# Altium PCB Kasli-DIOT.PCBDOC (part 13 of 23)
Units mm, origin at the board's own origin, x right, y up, seen from the top; angles counter-clockwise.
Board outline 222.9 x 100 mm, 10 copper layers (TopLayer, Layer 2, Layer 3, Layer 4, Layer 5, Layer 6, Layer 7, layer 8, Layer 9, BottomLayer), stack 1.564 mm thick; 977 components, 900 nets, 4676 pads, 2725 vias.
Unrouted connection lines stored in the file: 17.
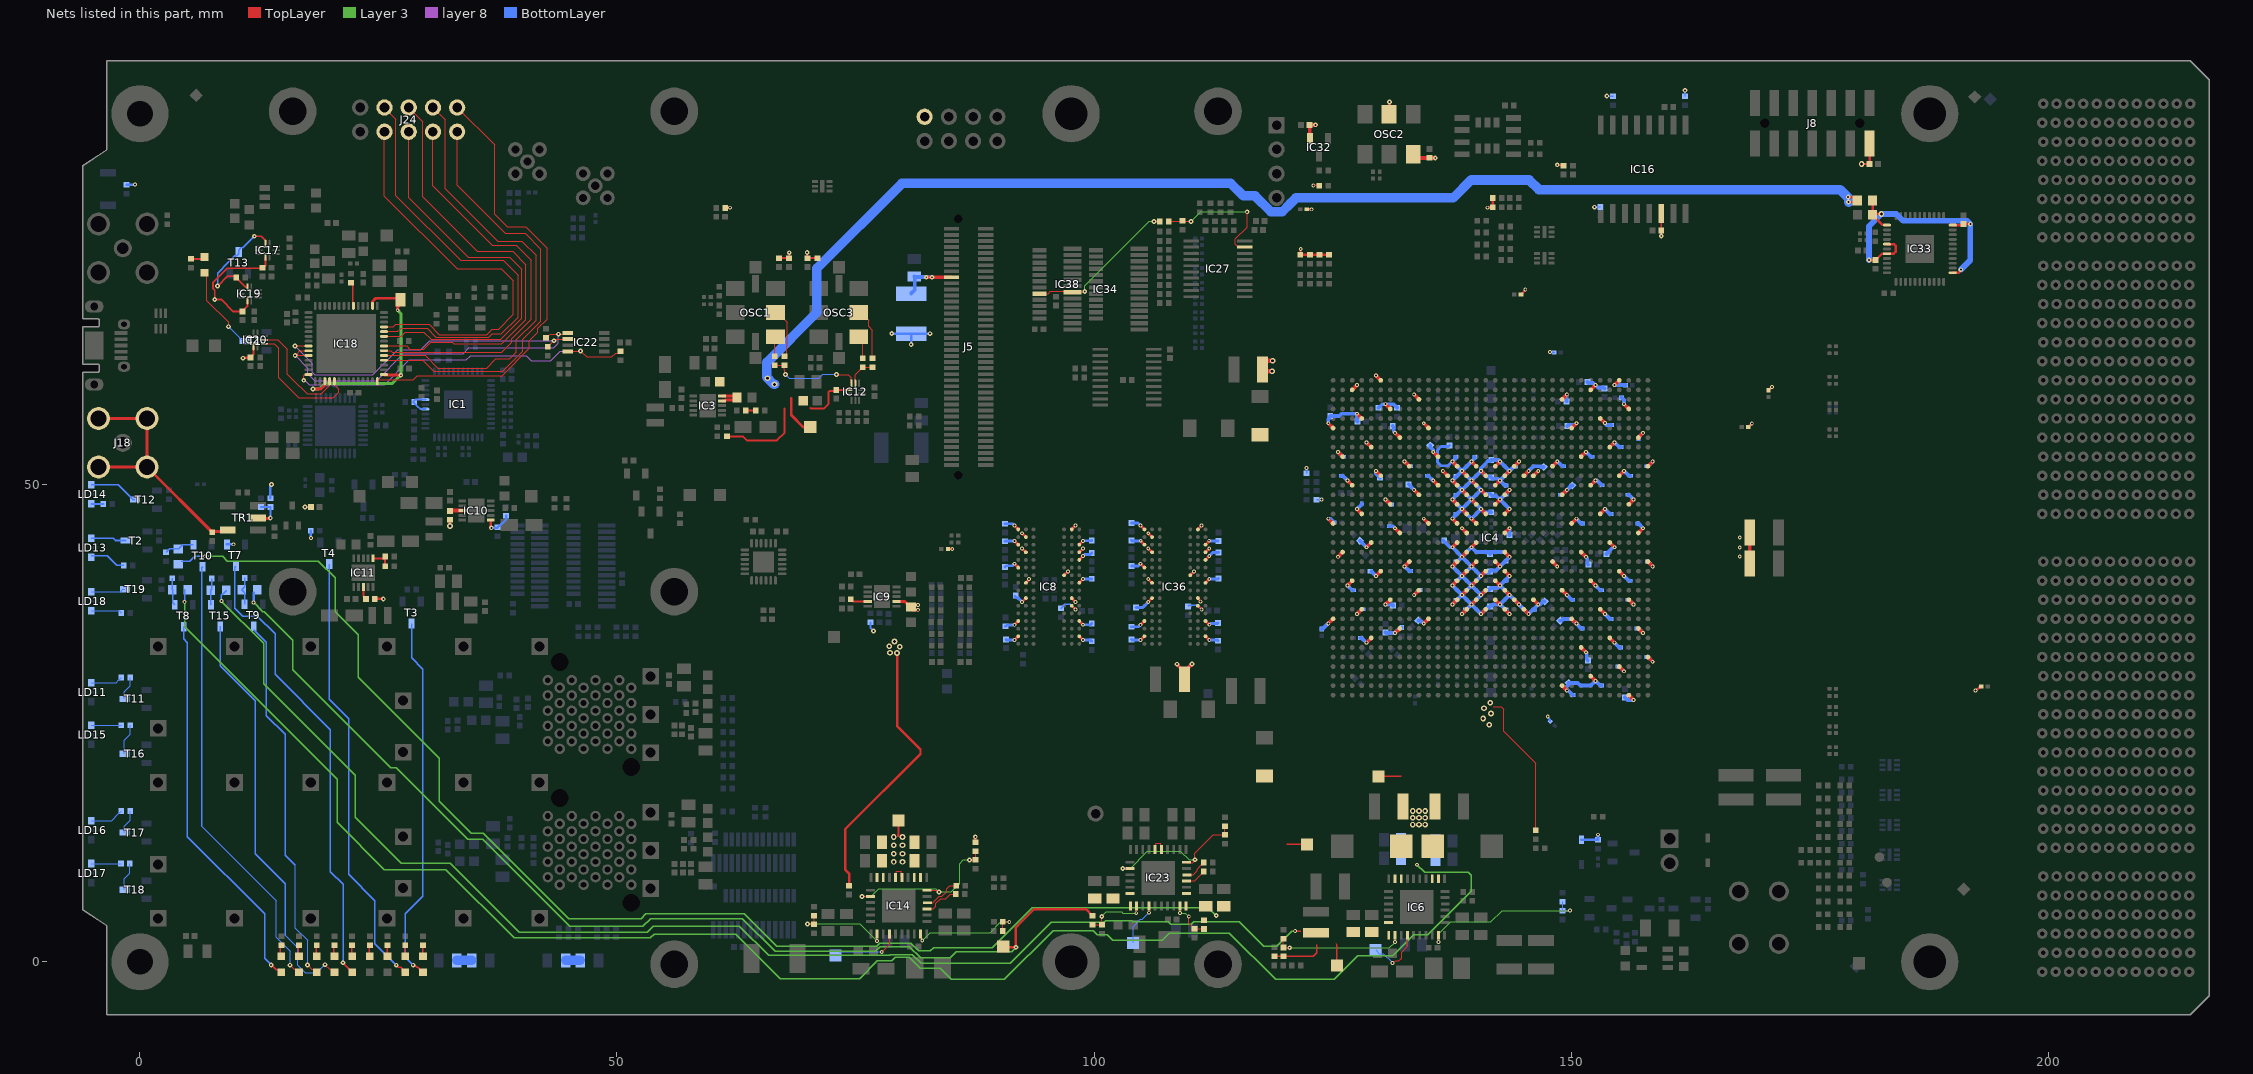
[diagram p19: the nets of this part, all layers, seen from the top]

## Via types
v1: diameter 0.4, hole 0.2, TopLayer to BottomLayer, tented both sides, 1723 vias
v2: diameter 0.5, hole 0.2, TopLayer to BottomLayer, tented both sides, 524 vias
v3: diameter 0.6, hole 0.3, TopLayer to BottomLayer, tented both sides, 172 vias
v4: diameter 0.6, hole 0.3, TopLayer to BottomLayer, 113 vias
v5: diameter 0.5, hole 0.2, TopLayer to BottomLayer, 107 vias
v6: diameter 0.4, hole 0.2, TopLayer to BottomLayer, 67 vias
v7: diameter 0.5, hole 0.25, TopLayer to BottomLayer, tented both sides, 12 vias
v8: diameter 0.8, hole 0.5, TopLayer to BottomLayer, tented both sides, 7 vias

## Nets (pads, with @x,y where several pads share a name; then routed paths per layer and width w, separated by ;. In a path a pad name is that pad's centre, name@x,y a point inside that pad or via, vN(x,y) a via of type N, cw(c..) or ccw(c..) an arc to the next point about the centre after c; other vN are vias at no path point) (continued)
NetIC6_24: IC6.24 R37.2 R39.1 | length 13.6
  TopLayer w0.127: R37.2@119.847,2.435 R39.1@119.847,1.5 119.872,1.475 v2(120.511,1.475) ; IC6.24@131.548,2.78 131.555,2.773 131.555,2.074 v1(131.561,2.067)
  Layer 3 w0.127: v2(120.511,1.475) 130.969,1.475 v1(131.561,2.067)
NetIC6_26: IC6.26 TP5.1 | length 6.2
  TopLayer w0.127: v1(131.304,-0.123) 131.359,-0.123 131.607,0.126 131.964,0.126 132.232,0.394 132.232,1.025 132.848,1.641 IC6.26@132.848,2.78
  BottomLayer w0.127: TP5.1@129.509,1.258 129.903,0.863 130.318,0.863 v1(131.304,-0.123)
NetIC6_31: IC6.31 R31.1 R32.2 | length 18
  TopLayer w0.127: v1(136.1,2.085) IC6.31@136.098,2.78
  Layer 3 w0.127: v1(136.1,2.085) 136.1,2.864 137.411,4.175 141.586,4.175 142.786,5.375 v1(149.886,5.375)
  BottomLayer w0.127: R31.1@149.111,6.285 R32.2@149.111,5.375 v1(149.886,5.375)
NetIC8_L8: IC8.L8 R99.2 | length 2.5
  TopLayer w0.22: IC8.L8@97.661,37.325 97.661,37.328 v1(98.061,36.928)
  BottomLayer w0.15: R99.2@96.536,37.07 96.556,37.07 96.771,37.285 96.771,37.305 96.948,37.482 97.506,37.482 v1(98.061,36.928)
NetIC9_9: IC9.9 R127.1 | length 1.5
  TopLayer w0.2: R127.1@74.75,37.775 IC9.9@76.28,37.775
NetIC10_3: IC10.3 R253.2 | length 1.3
  TopLayer w0.4: R253.2@32.481,47.3 IC10.3@33.761,47.3
NetIC10_6: IC10.6 R254.1 R256.1 | length 3.1
  TopLayer w0.25: IC10.6@36.761,46.3 36.761,45.627 36.831,45.557 v2(36.831,45.489)
  BottomLayer w0.25: v2(36.831,45.489) 36.859,45.517 37.458,45.517 R256.1@37.486,45.545 ; R256.1@37.506,45.545 R256.1@37.671,45.71 ; R256.1@37.687,45.679 38.386,46.378 R254.1@38.386,46.755
NetIC11_3: IC11.3 R56.2 | length 1.4
  TopLayer w0.2: IC11.3@23.411,39.287 23.411,38.337 23.691,38.057 R56.2@23.692,38.038
NetIC11_6: IC11.6 R250.1 R252.1 | length 2.1
  TopLayer w0.2: IC11.6@24.414,42.215 24.414,42.225 24.464,42.275 R250.1@25.504,42.275 ; R252.1@25.694,41.465 R250.1@25.694,42.465
NetIC12_4: IC12.4 R97.1 R98.2 | length 3
  TopLayer w0.125: IC12.4@74.986,60.65 74.986,61.555 75.514,62.083 75.514,62.103 75.741,62.33 R98.2@75.761,62.33 R97.1@76.761,62.33
NetIC12_5: IC12.5 R36.1 R38.2 | length 10
  TopLayer w0.125: R38.2@66.536,62.555 R36.1@67.536,62.555 67.536,62.077 67.601,62.012 67.601,61.635 v2(67.661,61.575) ; v2(73.011,61.575) 73.036,61.55 74.261,61.55 74.573,61.238 74.573,60.663 IC12.5@74.586,60.65
  BottomLayer w0.125: v2(67.661,61.575) 68.063,61.173 71.143,61.173 71.545,61.575 v2(73.011,61.575)
NetIC14_3: IC14.3 R48.2 | length 3.8
  TopLayer w0.1: IC14.3@82.498,5.55 83.161,5.55 83.436,5.825 83.436,6.125 83.911,6.6 84.436,6.6 84.936,7.1 R48.2@85.491,7.1
NetIC14_4: IC14.4 R51.2 | length 3.9
  TopLayer w0.1: IC14.4@82.536,6.188 83.099,6.188 83.78,6.869 84.055,6.869 84.54,7.354 84.54,7.646 84.87,7.975 R51.2@85.541,7.975
NetIC14_6: IC14.6 IC14.18 R47.2 R49.1 | length 18.2
  TopLayer w0.127: v2(75.686,6.85) IC14.18@76.573,6.85 ; IC14.6@82.498,7.508 83.477,7.508 83.66,7.325 v2(83.761,7.325) ; v2(86.936,10.675) R47.2@87.586,10.675 R49.1@87.586,11.61
  Layer 3 w0.127: v2(75.686,6.85) 75.727,6.891 76.676,6.891 77.449,7.663 83.423,7.663 v2(83.761,7.325) 85.061,7.325 85.911,8.175 85.911,10.275 86.311,10.675 v2(86.936,10.675)
NetIC14_11: IC14.11 IC14.12 | length 1.8
  TopLayer w0.127: IC14.12@79.211,8.838 79.26,8.887 79.26,9.416 79.335,9.49 79.737,9.49 79.812,9.416 79.812,8.887 IC14.11@79.861,8.838
NetIC14_24: IC14.24 R62.1 R64.2 | length 10.4
  TopLayer w0.127: v2(69.961,3.975) 70.652,3.975 70.667,3.99 R64.2@70.667,4.925 ; v1(77.241,2.187) 77.251,2.197 77.251,2.902 IC14.24@77.261,2.913
  Layer 3 w0.127: v2(69.961,3.975) 75.452,3.975 v1(77.241,2.187)
NetIC14_26: IC14.26 TP34.1 | length 6.7
  TopLayer w0.127: v1(77.754,1.041) 77.785,1.041 78.572,1.827 78.572,2.902 IC14.26@78.561,2.913
  BottomLayer w0.127: TP34.1@73.278,1.05 77.744,1.05 v1(77.754,1.041)
NetIC14_31: IC14.31 R156.1 R157.2 | length 12.3
  TopLayer w0.127: IC14.31@81.811,2.913 81.897,2.826 81.897,2.396 81.998,2.295 v6(81.998,2.221) ; R156.1@90.431,3.25 90.456,3.275 R157.2@90.456,4.2 90.477,4.179 v6(91.121,4.179)
  Layer 3 w0.127: v6(81.998,2.221) 82.827,3.05 89.111,3.05 90.24,4.179 v6(91.121,4.179)
NetIC17_2: IC17.2 IC19.2 R194.1 T13.3 | length 13.6
  TopLayer w0.15: v2(8.136,70.825) 9.161,71.85 R194.1@10.036,71.85 ; R194.1@10.069,71.575 10.211,71.575 11.071,70.715 IC19.2@11.266,70.715 ; v2(11.986,76.05) 12.711,76.05 13.171,75.59 IC17.2@13.171,75.287
  BottomLayer w0.15: v2(8.136,70.825) 8.136,72.2 9.273,73.338 ; v2(11.986,76.05) 10.77,74.834 10.586,74.834 10.361,74.609 T13.3@10.361,74.425 10.361,74.241 10.136,74.016 9.952,74.016 ; 9.273,73.338 9.952,74.016 ; 9.273,73.338 9.952,74.016
NetIC18_6: IC18.6 R199.2 | length 2.5
  TopLayer w0.2: R199.2@22.134,71.196 22.305,71.025 22.305,68.829 IC18.6@22.376,68.758
NetIC18_22: IC18.22 IC22.6 R207.1 | length 34.3
  TopLayer w0.125: v2(16.244,64.558) IC18.22@17.676,64.558 ; R207.1@42.711,64.55 42.825,64.55 43.55,65.275 IC22.6@44.861,65.275
  layer 8 w0.125: v2(16.244,64.558) 18.036,62.766 18.036,61.8 18.311,61.525 24.386,61.525 27.011,64.15 29.411,64.15 30.361,65.1 v2(43.386,65.1)
NetIC18_23: IC18.23 IC18.24 IC22.5 R206.1 | length 37.1
  TopLayer w0.125: 16.611,63.55 16.603,63.558 ; IC18.24@17.676,63.558 16.603,63.558 ; IC18.23@17.676,64.058 16.769,64.058 16.474,63.763 ; R206.1@42.811,65.6 42.811,65.605 42.993,65.788 v2(43.858,65.788) 44.723,65.788 IC22.5@44.861,65.925 ; 16.474,63.763 v2(16.269,63.558) 16.603,63.558 ; 16.474,63.763 16.474,63.688 16.603,63.558
  layer 8 w0.125: v2(16.269,63.558) 17.611,62.216 17.611,61.65 18.336,60.925 24.792,60.925 27.617,63.75 33.861,63.75 34.486,64.375 43.386,64.375 43.858,64.847 v2(43.858,65.788)
NetIC18_28: IC18.28 IC22.8 R208.2 | length 38.4
  TopLayer w0.125: v2(17.161,60.95) 17.161,61.45 17.236,61.525 17.643,61.525 IC18.28@17.676,61.558 ; IC22.8@44.861,63.975 44.911,64.025 v2(46.186,64.025) 46.811,63.4 49.461,63.4 49.854,63.793 50.133,63.793 R208.2@50.361,64.02
  layer 8 w0.125: v2(17.161,60.95) 17.161,61.075 17.738,60.498 25.641,60.498 28.23,63.088 34.224,63.088 34.686,63.55 40.511,63.55 41.034,63.027 43.06,63.027 44.058,64.025 v2(46.186,64.025)
NetIC18_32: IC18.32 IC20.9 | length 11.6
  TopLayer w0.125: IC20.9@13.001,65.189 14.447,65.189 15.436,64.2 15.436,61.6 15.956,61.08 17.511,59.525 18.988,59.525 19.876,60.413 IC18.32@19.876,60.858
NetIC18_33: IC18.33 IC20.8 | length 13.6
  TopLayer w0.125: IC20.8@13.001,64.789 14.072,64.789 14.536,64.325 14.536,61.225 16.636,59.125 20.279,59.125 20.855,59.7 20.855,60.021 20.376,60.5 IC18.33@20.376,60.858
NetIC18_42: IC18.42 J24.1 | length 48.5
  TopLayer w0.1: IC18.42@24.876,60.858 24.876,61.025 24.882,61.031 28.642,61.031 29.061,61.45 37.961,61.45 40.811,64.3 40.811,65.125 41.686,66 41.686,66.39 42.667,67.371 42.667,74.816 40.447,77.036 38.511,77.036 37.163,78.384 37.163,85.632 J24.1@33.248,89.548
NetIC18_46: IC18.46 J24.2 | length 44.5
  TopLayer w0.1: IC18.46@25.576,63.058 25.593,63.075 29.653,63.075 30.286,62.442 30.286,62.423 30.784,61.925 38.036,61.925 40.111,64 40.111,65.242 42.022,67.152 42.022,74.714 40.387,76.349 38.298,76.349 33.248,81.399 J24.2@33.248,87.008
NetIC18_47: IC18.47 J24.3 | length 47.6
  TopLayer w0.1: IC18.47@25.576,63.558 29.883,63.558 31.216,62.225 36.328,62.225 37.291,63.188 38.774,63.188 39.461,63.875 39.461,65.207 41.511,67.257 41.511,74.05 40.011,75.55 37.507,75.55 32.011,81.046 32.011,88.244 J24.3@30.708,89.548
NetIC18_48: IC18.48 J24.4 | length 42.6
  TopLayer w0.1: IC18.48@25.576,64.058 26.278,64.058 26.461,63.875 37.906,63.875 38.947,64.917 38.947,65.294 41.011,67.358 41.011,73.512 39.423,75.1 36.934,75.1 30.708,81.326 J24.4@30.708,87.008
NetIC18_49: IC18.49 J24.5 | length 45.9
  TopLayer w0.1: IC18.49@25.576,64.558 25.584,64.55 27.948,64.55 28.298,64.2 29.747,64.2 30.496,64.949 32.713,64.949 32.873,64.789 37.924,64.789 40.447,67.312 40.447,73.076 39.048,74.475 35.361,74.475 29.653,80.183 29.653,88.063 J24.5@28.168,89.548
NetIC18_51: IC18.51 J24.6 | length 42.9
  TopLayer w0.1: IC18.51@25.576,65.558 27.361,65.558 27.803,66 29.761,66 30.525,65.236 37.807,65.236 40.011,67.441 40.011,72.614 38.762,73.863 34.412,73.863 28.168,80.106 J24.6@28.168,87.008
NetIC18_52: IC18.52 J24.7 | length 45.8
  TopLayer w0.1: IC18.52@25.576,66.058 25.618,66.1 27.036,66.1 27.361,66.425 30.086,66.425 31.022,65.49 36.551,65.49 36.9,65.839 37.891,65.839 39.627,67.575 39.627,71.966 38.068,73.525 33.621,73.525 26.835,80.311 26.835,88.34 J24.7@25.628,89.548
NetIC18_53: IC18.53 J24.8 | length 42.4
  TopLayer w0.1: IC18.53@25.576,66.558 26.536,66.558 26.803,66.825 30.311,66.825 31.382,65.754 36.36,65.754 36.934,66.328 37.584,66.328 39.134,67.879 39.134,71.397 37.881,72.65 33.236,72.65 25.628,80.258 J24.8@25.628,87.008
NetIC23_3: IC23.3 R65.2 | length 2.3
  TopLayer w0.1: IC23.3@109.699,8.475 110.54,8.475 111.281,9.216 111.281,9.243 R65.2@111.521,9.483
NetIC23_4: IC23.4 R67.2 | length 2.4
  TopLayer w0.1: IC23.4@109.736,9.113 110.41,9.113 110.822,9.525 110.822,9.711 111.261,10.151 111.281,10.151 111.521,10.391 R67.2@111.521,10.411
NetIC23_6: IC23.6 IC23.18 R5.1 R26.2 | length 16.1
  TopLayer w0.127: v5(103.011,9.775) IC23.18@103.774,9.775 ; IC23.6@109.699,10.433 109.745,10.387 110.334,10.387 110.586,10.639 v5(110.586,10.7) 110.586,11.4 112.506,13.32 R26.2@113.711,13.32 R5.1@113.711,14.23
  Layer 3 w0.127: v5(103.011,9.775) 103.774,9.775 105.599,11.6 109.061,11.6 109.961,10.7 v5(110.586,10.7)
NetIC23_11: IC23.11 IC23.12 | length 1.8
  TopLayer w0.127: IC23.12@106.41,11.775 106.459,11.825 106.459,12.354 106.534,12.428 106.936,12.428 107.01,12.354 107.01,11.825 IC23.11@107.06,11.775
NetIC23_24: IC23.24 R59.1 R60.2 | length 6.5
  TopLayer w0.127: R59.1@99.862,3.881 100.814,3.881 R60.2@100.825,3.87 100.825,4.748 v2(100.814,4.759) ; v1(104.427,5.098) 104.444,5.115 104.444,5.821 IC23.24@104.461,5.838
  Layer 3 w0.127: v2(100.814,4.759) 101.284,5.228 102.883,5.228 103.013,5.098 v1(104.427,5.098)
NetIC23_26: IC23.26 TP36.1 | length 4.7
  TopLayer w0.127: v1(105.761,5.15) IC23.26@105.761,5.838
  BottomLayer w0.127: TP36.1@104.1,1.975 104.1,3.682 104.864,4.446 105.057,4.446 v1(105.761,5.15)
NetIC23_31: IC23.31 R152.1 R153.2 | length 4.3
  TopLayer w0.127: v6(109.009,5.102) v6(109.009,5.102) 109.01,5.837 IC23.31@109.011,5.838 ; v1(109.936,4.751) 109.936,4.064 110.288,3.712 110.288,3.692 110.515,3.466 111.484,3.466 R152.1@111.512,3.439
  Layer 3 w0.127: v6(109.009,5.102) 109.585,5.102 v1(109.936,4.751)
NetIC36_L8: IC36.L8 R100.2 | length 2.2
  TopLayer w0.22: IC36.L8@110.886,37.325 110.886,37.328 v1(111.286,36.928)
  BottomLayer w0.15: R100.2@109.861,37.245 109.977,37.361 110.853,37.361 v1(111.286,36.928)
NetJ18_2: J18.2 R214.2 TR1.4 | length 26.3
  TopLayer w0.3: J18.2@-4.34,51.86 J18.2@0.557,51.86 ; J18.2@-4.34,56.94 J18.2@0.74,56.94 J18.2@0.74,51.86 7.409,45.191 7.482,45.191 7.574,45.098 TR1.4@9.207,45.098
NetLD1_1: LD1.1 T1.3 | length 8.8
  TopLayer w0.125: LD1.1@6.761,72.225 7.011,71.975 7.011,69.3 9.286,67.025 v2(9.286,66.575)
  BottomLayer w0.125: v2(9.286,66.575) T1.3@10.799,65.062
NetLD1_2: LD1.2 R15.1 | length 1.3
  TopLayer w0.2: R15.1@5.355,73.686 6.525,73.686 LD1.2@6.636,73.575
NetLD2_1: LD2.1 T3.3 | length 38.8
  TopLayer w0.15: v2(28.636,-0.35) 28.808,-0.35 29.013,-0.554 29.115,-0.554 29.422,-0.861 29.422,-0.963 LD2.1@29.626,-1.168
  BottomLayer w0.15: T3.3@28.474,35.46 28.474,31.854 29.653,30.675 29.653,6.853 27.825,5.025 27.825,0.461 v2(28.636,-0.35)
NetLD2_2: LD2.2 R44.1 | length 1.2
  TopLayer w0.15: LD2.2@29.626,0.482 R44.1@29.626,1.727
NetLD3_1: LD3.1 T4.3 | length 46.2
  TopLayer w0.15: v2(26.861,-0.35) 27.065,-0.554 27.315,-0.554 27.474,-0.713 27.474,-0.963 LD3.1@27.679,-1.168
  BottomLayer w0.15: T4.3@19.844,41.675 19.844,27.517 21.877,25.484 21.877,9.17 24.625,6.422 24.625,1.886 v2(26.861,-0.35)
NetLD3_2: LD3.2 R55.1 | length 1.2
  TopLayer w0.15: LD3.2@27.763,0.482 R55.1@27.763,1.727
NetLD5_1: LD5.1 T7.3 | length 48.7
  TopLayer w0.15: v2(21.286,-0.1) 21.286,-0.15 22.175,-1.039 LD5.1@22.175,-1.168
  BottomLayer w0.15: T7.3@10.061,41.467 9.914,41.32 9.914,37.086 10.777,36.223 12.312,36.223 14.161,34.374 14.161,30.12 19.961,24.32 19.961,9.439 21.286,8.114 v2(21.286,-0.1)
NetLD5_2: LD5.2 R88.1 | length 1.2
  TopLayer w0.15: LD5.2@22.175,0.482 R88.1@22.175,1.727
NetLD6_1: LD6.1 T8.3 | length 40.6
  TopLayer w0.15: v2(13.75,-0.325) 14.279,-0.854 14.596,-0.854 LD6.1@14.817,-1.075
  BottomLayer w0.15: T8.3@4.586,35.137 4.586,33.839 4.961,33.464 4.961,13.125 13.053,5.033 13.053,0.372 v2(13.75,-0.325)
NetLD6_2: LD6.2 R89.1 | length 1.2
  TopLayer w0.15: LD6.2@14.725,0.482 R89.1@14.725,1.727
NetLD7_1: LD7.1 T9.3 | length 38.8
  TopLayer w0.125: v2(17.561,-0.325) 18.013,-0.777 18.23,-0.777 LD7.1@18.528,-1.075
  BottomLayer w0.125: 16.295,10.116 16.295,3.505 17.561,2.239 v2(17.561,-0.325)
  BottomLayer w0.15: T9.3@11.911,34.825 13.261,33.475 13.261,25.788 15.219,23.83 15.219,11.192 16.295,10.116
NetLD7_2: LD7.2 R90.1 | length 1.2
  TopLayer w0.15: LD7.2@18.45,0.482 R90.1@18.45,1.727
NetLD8_1: LD8.1 T10.3 | length 46.9
  TopLayer w0.125: v2(15.736,-0.35) 16.159,-0.773 16.37,-0.773 LD8.1@16.672,-1.075
  BottomLayer w0.125: 6.475,14.211 14.261,6.425 14.261,2.6 15.736,1.125 v2(15.736,-0.35)
  BottomLayer w0.15: 6.475,14.211 6.475,40.77 6.475,41.321 T10.3@6.554,41.4
NetLD8_2: LD8.2 R91.1 | length 1.2
  TopLayer w0.15: LD8.2@16.587,0.482 R91.1@16.587,1.727
NetLD9_2: LD9.2 R86.1 | length 1.2
  TopLayer w0.15: LD9.2@25.901,0.482 R86.1@25.901,1.727
NetLD10_2: LD10.2 R87.1 | length 1.2
  TopLayer w0.15: LD10.2@24.038,0.482 R87.1@24.038,1.727
NetLD11_1: LD11.1 R143.2 | length 3.4
  BottomLayer w0.125: LD11.1@-5.1,29.25 -2.509,29.25 -2.206,29.553 -2.186,29.553 -1.959,29.78 R143.2@-1.959,29.8
NetLD12_1: LD12.1 T15.3 | length 43.7
  TopLayer w0.125: v2(19.386,-0.3) 19.869,-0.783 20.091,-0.783 LD12.1@20.383,-1.075
  BottomLayer w0.125: 15.219,2.806 16.525,1.5 16.525,-0.35 17.343,-1.168 18.518,-1.168 v2(19.386,-0.3)
  BottomLayer w0.15: T15.3@8.405,35.148 8.405,31.033 12.063,27.375 12.063,11.35 15.219,8.194 15.219,2.806
NetLD12_2: LD12.2 R74.1 | length 1.2
  TopLayer w0.15: LD12.2@20.313,0.482 R74.1@20.313,1.727
NetLD13_1: LD13.1 T2.3 | length 3.7
  BottomLayer w0.2: LD13.1@-5.1,44.4 -2.789,44.4 -2.551,44.162 T2.3@-1.536,44.162
NetLD13_2: LD13.2 R11.1 | length 3.8
  BottomLayer w0.15: LD13.2@-5.1,42.55 -3.417,42.55 -2.417,41.55 R11.1@-1.709,41.55
NetLD14_1: LD14.1 T12.3 | length 5.2
  BottomLayer w0.15: LD14.1@-5.1,50 -2.26,50 -0.951,48.691 -0.951,48.675 -0.726,48.45 T12.3@-0.526,48.45
NetLD14_2: LD14.2 R20.1 | length 1.3
  BottomLayer w0.2: LD14.2@-5.1,48 -3.87,48 R20.1@-3.845,47.975
NetLD15_1: LD15.1 R142.2 | length 3.1
  BottomLayer w0.125: LD15.1@-5.1,24.8 R142.2@-1.959,24.8
NetLD16_1: LD16.1 R216.2 | length 3.6
  BottomLayer w0.125: LD16.1@-5.1,14.8 -2.959,14.8 -2.206,15.553 -2.186,15.553 -1.959,15.78 R216.2@-1.959,15.8
NetLD17_1: LD17.1 R220.2 | length 3.1
  BottomLayer w0.125: LD17.1@-5.1,10.3 R220.2@-1.989,10.3
NetLD18_1: LD18.1 T19.3 | length 3.6
  BottomLayer w0.125: LD18.1@-5.1,38.8 -2.038,38.8 -1.788,39.05 T19.3@-1.588,39.05
NetLD18_2: LD18.2 R226.1 | length 3.3
  BottomLayer w0.125: LD18.2@-5.1,36.8 -2.189,36.8 -1.959,36.57 R226.1@-1.959,36.55
NetOSC1_1: OSC1.1 R38.1 | length 2
  TopLayer w0.125: R38.1@66.536,63.495 66.536,65.41 OSC1.1@66.611,65.485
NetOSC1_2: OSC1.2 R36.2 | length 5.3
  TopLayer w0.125: OSC1.2@66.611,68.025 66.836,68.025 67.837,67.024 67.837,64.572 67.783,64.518 67.783,63.722 67.556,63.495 R36.2@67.536,63.495
NetOSC3_1: OSC3.1 R98.1 | length 2.4
  TopLayer w0.125: OSC3.1@75.361,65.485 75.761,65.085 R98.1@75.761,63.27
NetOSC3_2: OSC3.2 R97.2 | length 5.5
  TopLayer w0.125: OSC3.2@75.361,68.025 75.586,68.025 76.373,67.238 76.373,66.612 76.761,66.224 R97.2@76.761,63.27
NetR10_1: R10.1 R28.2 | length 1.1
  TopLayer w0.2: R10.1@63.481,57.8 R28.2@64.541,57.8
NetR69_2: R69.2 R70.1 | length 1.5
  BottomLayer w1: R69.2@44.611,0.15 R70.1@46.161,0.15
NetR71_2: R71.2 R72.1 | length 1.6
  BottomLayer w1: R72.1@33.211,0.15 R71.2@34.774,0.15
NetR139_2: R139.2 R154.1 TR1.2 | length 3.6
  TopLayer w0.3: TR1.2@12.376,46.525 12.547,46.354 TR1.2@12.67,46.354 ; TR1.2@12.67,46.436 12.714,46.481 13.563,46.481 13.607,46.525 v2(13.661,46.525)
  BottomLayer w0.2: R154.1@12.697,47.675 R139.2@13.697,47.675 ; v2(13.661,46.525) 13.699,46.563 R139.2@13.699,47.675
NetR142_1: R142.1 T16.3 | length 3.3
  BottomLayer w0.125: T16.3@-1.639,21.8 -1.639,23.21 -1.019,23.83 R142.1@-1.019,24.8
NetR143_1: R143.1 T11.3 | length 2.5
  BottomLayer w0.125: T11.3@-1.639,27.55 -1.639,28.3 -1.019,28.92 R143.1@-1.019,29.8
NetR216_1: R216.1 T17.3 | length 2.5
  BottomLayer w0.125: T17.3@-1.639,13.55 -1.639,14.21 -1.019,14.83 R216.1@-1.019,15.8
NetR220_1: R220.1 T18.3 | length 3
  BottomLayer w0.125: T18.3@-1.639,7.55 -1.639,8.71 -1.049,9.3 R220.1@-1.049,10.3
NetR299_1: R299.1 R306.1 T8.1 | length 2.9
  BottomLayer w0.15: R306.1@3.402,40.204 3.402,39.008 R299.1@3.394,39.001 3.416,38.979 3.416,38.048 3.422,38.042 3.422,37.651 T8.1@3.636,37.437
NetR302_1: R302.1 R307.1 T9.1 | length 3
  BottomLayer w0.15: T9.1@10.961,37.463 10.961,38.695 R302.1@10.676,38.981 10.992,39.297 R307.1@10.992,40.235
NetR303_1: R303.1 R308.1 T10.1 | length 3.2
  BottomLayer w0.15: R308.1@2.747,42.92 2.767,42.92 2.982,43.135 2.982,43.155 3.102,43.275 R303.1@4.011,43.275 4.061,43.275 4.486,43.7 T10.1@5.604,43.7
NetR309_1: R309.1 R310.1 T15.1 | length 2.8
  BottomLayer w0.15: T15.1@7.455,37.448 7.425,37.478 R309.1@7.425,38.962 7.516,39.053 R310.1@7.516,40.175
O\E\: IC27.19 R147.2 R297.1 | length 13.7
  TopLayer w0.127: R147.2@107.853,77.593 107.869,77.609 v2(110.175,77.609) ; IC27.19@115.861,74.997 115.034,74.997 114.818,75.212 114.818,75.774 116.052,77.007 v2(116.052,78.611)
  Layer 3 w0.127: v2(110.175,77.609) 111.178,78.611 v2(116.052,78.611)
O\E\b: IC34.8 IC38.20 R147.1 | length 16.2
  TopLayer w0.127: IC38.20@94.297,70.036 95.178,70.036 95.419,70.276 97.657,70.276 IC34.8@97.747,70.186 97.812,70.25 v2(99.033,70.25) ; v2(106.3,77.609) 106.897,77.609 R147.1@106.913,77.593
  Layer 3 w0.127: v2(99.033,70.25) 99.033,70.876 105.766,77.609 v2(106.3,77.609)
OE: IC1.16 IC1.18 R4.1 | length 3
  BottomLayer w0.2: IC1.16@29.911,57.928 29.892,57.947 29.375,57.947 29.14,58.182 29.104,58.182 28.631,58.655 28.631,58.675 28.631,58.695 28.864,58.928 IC1.18@29.911,58.928
P1V0: C42.2 C48.2 C91.1 C95.2 C102.2 C103.2 C104.2 C105.2 C106.2 C107.2 C108.2 C110.2 C111.2 C123.2 C124.2 C130.2 C131.2 C134.2 C135.2 C143.2 C346.1 C352.2 C355.2 C356.2 C357.2 C358.2 C359.2 C360.2 C361.2 C373.2 C374.2 C375.2 C376.2 C377.2 C378.2 C379.2 C380.2 IC4.AA15 IC4.AA17 IC4.AA19 IC4.AB14 IC4.AB16 IC4.AB18 IC4.AC15 IC4.AC17 IC4.AC19 IC4.AD14 IC4.AD16 IC4.AD18 IC4.AD20 IC4.AD22 IC4.AE15 IC4.AE17 IC4.AE19 IC4.AE21 IC4.K14 IC4.K16 IC4.K18 IC4.K20 IC4.L15 IC4.L17 IC4.L19 IC4.L21 IC4.M14 IC4.M16 IC4.M18 IC4.N15 IC4.N17 IC4.N19 IC4.P14 IC4.P16 IC4.P18 IC4.R15 IC4.R17 IC4.R19 IC4.T14 IC4.T16 IC4.U15 IC4.U19 IC4.V14 IC4.V16 IC4.W15 IC4.W19 IC4.Y14 IC4.Y16 IC4.Y18 IC6.8 IC6.9 IC6.14 IC6.15 R16.2 R299.2 TP9.1 | length 330.9
  TopLayer w0.127: 141.836,26.725 142.661,26.725 142.936,26.45 142.936,24.191 146.303,20.824 R16.2@146.303,13.775
  TopLayer w0.15: TP9.1@129.811,19.425 132.211,19.425
  TopLayer w0.4: v1(137.561,37.45) IC4.AD14@138.061,37.95 ; v1(137.561,39.45) IC4.AB14@138.061,39.95 ; v1(137.561,41.45) IC4.Y14@138.061,41.95 ; v1(137.561,43.45) IC4.V14@138.061,43.95 ; v1(137.561,46.45) IC4.T14@138.061,45.95 ; v1(137.561,48.45) IC4.P14@138.061,47.95 ; v1(137.561,50.45) IC4.M14@138.061,49.95 ; v1(137.561,52.45) IC4.K14@138.061,51.95 ; v1(138.561,36.45) IC4.AE15@139.061,36.95 ; v1(138.561,38.45) IC4.AC15@139.061,38.95 ; v1(138.561,40.45) IC4.AA15@139.061,40.95 ; v1(138.561,42.45) IC4.W15@139.061,42.95 ; v1(138.561,45.45) IC4.U15@139.061,44.95 ; v1(138.561,47.45) IC4.R15@139.061,46.95 ; v1(138.561,49.45) IC4.N15@139.061,48.95 ; v1(138.561,51.45) IC4.L15@139.061,50.95 ; v1(139.561,37.45) IC4.AD16@140.061,37.95 ; v1(139.561,39.45) IC4.AB16@140.061,39.95 ; v1(139.561,41.45) IC4.Y16@140.061,41.95 ; v1(139.561,43.45) IC4.V16@140.061,43.95 ; v1(139.561,46.45) IC4.T16@140.061,45.95 ; v1(139.561,48.45) IC4.P16@140.061,47.95 ; v1(139.561,50.45) IC4.M16@140.061,49.95 ; v1(139.561,52.45) IC4.K16@140.061,51.95 ; v1(140.561,36.45) IC4.AE17@141.061,36.95 ; v1(140.561,38.45) IC4.AC17@141.061,38.95 ; v1(140.561,40.45) IC4.AA17@141.061,40.95 ; v1(140.561,47.45) IC4.R17@141.061,46.95 ; v1(140.561,49.45) IC4.N17@141.061,48.95 ; v1(140.561,51.45) IC4.L17@141.061,50.95 ; IC4.AD18@142.061,37.95 v1(142.561,37.45) ; IC4.AB18@142.061,39.95 v1(142.561,39.45) ; IC4.Y18@142.061,41.95 v1(142.561,41.45) ; IC4.P18@142.061,47.95 v1(142.561,48.45) ; IC4.M18@142.061,49.95 v1(142.561,50.45) ; IC4.K18@142.061,51.95 v1(142.561,52.45) ; IC4.AE19@143.061,36.95 v1(143.561,36.45) ; IC4.AC19@143.061,38.95 v1(143.561,38.45) ; IC4.AA19@143.061,40.95 v1(143.561,40.45) ; IC4.W19@143.061,42.95 v1(143.561,42.45) ; IC4.U19@143.061,44.95 v1(143.561,45.45) ; IC4.R19@143.061,46.95 v1(143.561,47.45) ; IC4.N19@143.061,48.95 v1(143.561,49.45) ; IC4.L19@143.061,50.95 v1(143.561,51.45) ; IC4.AD20@144.061,37.95 v1(144.561,37.45) ; IC4.K20@144.061,51.95 v1(144.561,52.45) ; IC4.AE21@145.061,36.95 v1(145.561,36.45) ; IC4.L21@145.061,50.95 v1(145.561,51.45) ; IC4.AD22@146.061,37.95 v1(146.561,37.45)
  Layer 3 w0.15: v1@4.669,37.754 4.669,35.142 20.661,19.15 20.661,14.625 25.611,9.675 32.036,9.675 39.214,2.497 53.483,2.497 53.886,2.9 62.473,2.9 67.123,-1.75 75.436,-1.75 77.286,0.1 78.778,0.1 79.161,0.483 80.653,0.483 81.811,-0.675 83.861,-0.675 85.036,-1.85 90.6,-1.85 95.725,3.275 99.936,3.275 100.358,2.853 101.366,2.853 101.944,2.275 105.821,2.275 105.823,2.277 107.157,2.277 107.892,3.013 114.187,3.013 119.025,-1.825 125.186,-1.825 127.661,0.65 131.307,0.65 133.507,2.85 134.97,2.85 139.536,7.416 139.536,9.05 139.211,9.375 134.65,9.375 v1(133.85,10.175)
  BottomLayer w0.15: R299.2@4.664,39.001 4.669,38.996 v1(4.669,37.733)
  BottomLayer w0.3: C358.2@137.261,54.125 137.136,54 136.381,54 136.011,53.63 136.011,52.364 136.375,52 137.092,52 137.542,52.45 v1(137.561,52.45)
  BottomLayer w0.4: C357.2@136.611,44.15 137.311,43.45 v1(137.561,43.45) v1(138.561,42.45) ; v1(137.561,39.45) v1(138.561,38.45) ; 137.761,39.65 v1(138.561,40.45) ; C104.2@137.911,46.975 137.886,46.975 137.886,46.783 137.878,46.775 137.878,46.77 137.561,46.453 v1(137.561,46.45) v1(138.561,47.45) ; C95.2@137.911,48.95 C95.2@138.061,48.95 ; C373.2@137.911,52.938 137.886,52.938 137.886,52.772 137.818,52.704 137.818,52.684 137.584,52.45 v1(137.561,52.45) v1(138.561,51.45) ; v1(138.561,36.45) v1(139.561,37.45) ; C374.2@139.911,52.925 139.886,52.925 139.886,52.77 139.807,52.691 139.807,52.671 139.585,52.45 v1(139.561,52.45) v1(138.561,51.45) ; C352.2@141.401,42.835 C352.2@141.511,42.725 C352.2@141.621,42.835 ; C352.2@141.511,42.95 143.061,42.95 v1(143.561,42.45) v1(142.561,41.45) 142.121,41.01 141.621,41.01 C134.2@141.511,40.9 141.401,40.79 140.901,40.79 v1(140.561,40.45) ; C356.2@141.526,47.235 C356.2@141.636,47.125 140.886,47.125 v1(140.561,47.45) ; C352.2@141.621,42.95 140.061,42.95 v1(139.561,43.45) v1(138.561,42.45) ; C107.2@143.211,39.95 143.236,39.95 143.236,40.125 v1(143.561,40.45) v1(142.561,39.45) ; C376.2@143.211,49.925 143.086,49.925 v1(142.561,50.45) ; C143.2@143.536,44.75 143.561,44.775 v1(143.561,45.45) ; v1(143.561,36.45) 143.319,36.692 143.319,36.708 142.578,37.45 v1(142.561,37.45) ; v1(143.561,47.45) v1(142.561,48.45) ; v1(143.561,49.45) v1(142.561,48.45) ; C375.2@144.211,51.925 144.036,51.925 v1(143.561,51.45) ; v1(145.561,51.45) 146.061,51.95 146.768,51.95 146.85,51.868 C124.2@147.143,51.868 ; C380.2@146.211,36.925 146.036,36.925 v1(145.561,36.45) ; C123.2@147.243,37.768 147.087,37.768 146.769,37.45 v1(146.561,37.45) v1(145.561,36.45) ; C95.2@138.061,48.95 v1(138.561,49.45) ; C95.2@138.061,48.95 v1(137.561,48.45) v1(138.561,47.45) ; v1(138.561,38.45) v1(139.561,39.45) ; v1(138.561,38.45) v1(139.561,37.45) ; v1(138.561,38.45) v1(137.561,37.45) v1(138.561,38.45) ; v1(138.561,40.45) v1(139.561,41.45) ; v1(138.561,40.45) v1(137.561,41.45) v1(138.561,42.45) ; v1(138.561,40.45) v1(139.561,39.45) ; v1(138.561,42.45) v1(139.561,41.45) ; v1(138.561,47.45) v1(139.561,48.45) ; v1(138.561,47.45) v1(139.561,46.45) v1(140.561,47.45) ; v1(138.561,49.45) v1(139.561,50.45) ; v1(138.561,49.45) v1(139.561,48.45) ; v1(138.561,49.45) v1(137.561,50.45) v1(138.561,51.45) ; v1(138.561,51.45) v1(139.561,50.45) ; v1(139.561,37.45) v1(140.561,36.45) 141.251,37.14 141.401,37.14 141.621,37.36 141.776,37.36 141.866,37.45 v1(142.561,37.45) ; v1(139.561,37.45) v1(140.561,38.45) ; v1(139.561,39.45) v1(140.561,40.45) ; v1(139.561,39.45) v1(140.561,38.45) ; v1(139.561,41.45) v1(140.561,40.45) ; v1(139.561,48.45) v1(140.561,49.45) ; v1(139.561,48.45) v1(140.561,47.45) ; v1(139.561,50.45) v1(140.561,51.45) ; v1(139.561,50.45) v1(140.561,49.45) ; v1(140.561,38.45) 141.076,38.965 141.401,38.965 C110.2@141.511,39.075 141.621,39.185 142.296,39.185 v1(142.561,39.45) ; v1(140.561,49.45) 140.951,49.06 141.526,49.06 C135.2@141.636,48.95 141.746,48.84 142.171,48.84 v1(142.561,48.45) ; v1(140.561,51.45) 141.151,50.86 141.526,50.86 C355.2@141.636,50.75 141.746,50.64 142.371,50.64 v1(142.561,50.45) ; v1(140.561,51.45) 140.561,51.743 141.061,52.243 141.061,52.256 141.295,52.49 141.526,52.49 C361.2@141.636,52.6 142.411,52.6 v1(142.561,52.45) v1(143.561,51.45) ; v1(142.561,37.45) v1(143.561,38.45) ; v1(142.561,39.45) v1(143.561,38.45) ; v1(142.561,50.45) v1(143.561,51.45) ; v1(143.561,38.45) v1(144.561,37.45) v1(145.561,36.45)
  other v3: 133.411,14.375 134.061,14.375 134.711,14.375 133.411,15.1 134.061,15.1 134.711,15.1 133.411,15.8 134.061,15.8 134.711,15.8 141.436,24.85 140.786,25.5 141.611,26.025 140.886,26.575 141.536,27.15
P1V2: C387.2 C388.2 FB1.1 FB2.1 IC23.1 IC23.32 R152.2 R303.2 TP11.1 | length 138.2
  TopLayer w0.15: 120.186,12.325 120.211,12.3 TP11.1@122.336,12.3
  Layer 3 w0.15: v1(6.791,42.506) 8.672,42.506 9.167,42.011 18.693,42.011 20.467,40.236 20.467,36.689 22.818,34.337 22.862,34.293 22.862,29.848 31.39,21.32 31.39,16.821 34.716,13.496 35.97,13.496 44.935,4.531 52.536,4.531 53.036,5.031 63.355,5.031 66.752,1.634 77.218,1.634 77.534,1.95 80.811,1.95 81.611,1.15 82.861,1.15 83.211,1.5 89.336,1.5 93.511,5.675 111.992,5.675 v5(112.817,4.85)
  BottomLayer w0.15: R303.2@4.305,41.988 5.2,41.988 5.717,42.506 v1(6.791,42.506)
P1V5: C86.2 C92.2 C150.2 C153.2 C154.2 C155.2 C156.2 C170.2 C171.2 C176.2 C302.2 C381.2 C451.2 C452.2 C453.2 C454.2 C455.2 C456.2 C457.2 C458.2 C459.2 C460.2 C461.2 C462.2 C463.2 C464.2 C465.2 C466.2 C467.2 C468.2 C469.2 C470.2 C480.2 C481.2 C482.2 C483.2 C484.2 C485.2 IC4.AA6 IC4.AB3 IC4.AC10 IC4.AD7 IC4.AE4 IC4.AF1 IC4.AF11 IC4.AG8 IC4.AH5 IC4.V5 IC4.W2 IC4.Y9 IC8.A1 IC8.A8 IC8.B2 IC8.C1 IC8.C9 IC8.D2 IC8.D9 IC8.E9 IC8.F1 IC8.G7 IC8.H2 IC8.H9 IC8.K2 IC8.K8 IC8.N1 IC8.N9 IC8.R1 IC8.R9 IC9.2 IC23.22 IC23.23 IC36.A1 IC36.A8 IC36.B2 IC36.C1 IC36.C9 IC36.D2 IC36.D9 IC36.E9 IC36.F1 IC36.G7 IC36.H2 IC36.H9 IC36.K2 IC36.K8 IC36.N1 IC36.N9 IC36.R1 IC36.R9 R59.2 R63.2 R128.1 R302.2 TP10.1 | length 210.1
  TopLayer w0.22: IC8.H9@98.458,39.725 IC8.H9@98.461,39.725 ; IC8.C9@98.458,43.725 IC8.C9@98.461,43.725 ; IC36.H9@111.683,39.725 IC36.H9@111.686,39.725 ; IC36.C9@111.683,43.725 IC36.C9@111.686,43.725
  TopLayer w0.254: R63.2@74.336,7.995 74.336,9.25 73.911,9.675 73.911,13.9 81.811,21.8 81.811,22.25 79.361,24.7 v3(79.361,32.375) ; TP10.1@90.492,1.625 90.592,1.525 v5(91.811,1.525) 91.811,3.6 91.986,3.775 93.731,5.52 99.143,5.52 99.842,4.821 R59.2@99.862,4.821
  TopLayer w0.3: IC9.2@79.28,37.775 80.164,37.775 80.747,37.192 C176.2@80.797,37.192 81.005,37.4 v1(81.561,37.4) ; C176.2@81.007,36.894 v1(81.563,36.894) ; v1(91.661,41.722) IC8.F1@92.061,41.322 ; v1(91.661,44.122) IC8.C1@92.061,43.722 ; v1(91.661,45.722) IC8.A1@92.061,45.322 ; v1(91.664,33.725) IC8.R1@92.064,34.125 ; v1(91.664,35.325) IC8.N1@92.064,35.725 ; v1(92.461,43.322) IC8.D2@92.861,42.922 ; v1(92.461,44.922) IC8.B2@92.861,44.522 ; v1(92.464,37.725) IC8.K2@92.864,38.125 ; IC8.H2@92.861,39.725 93.152,40.016 93.152,40.113 v1(93.171,40.133) ; IC8.G7@96.858,40.525 v1(97.258,40.925) ; IC8.A8@97.658,45.325 v1(98.058,45.725) ; IC8.K8@97.661,38.128 v1(98.061,37.728) ; IC8.H9@98.458,39.725 v1(98.858,40.125) ; IC8.E9@98.458,42.125 v1(98.858,42.525) ; IC8.D9@98.458,42.925 v1(98.858,43.325) ; IC8.C9@98.458,43.725 v1(98.858,44.125) ; IC8.R9@98.461,34.128 v1(98.861,33.728) ; IC8.N9@98.461,35.728 v1(98.861,35.328) ; v1(104.886,41.722) IC36.F1@105.286,41.322 ; v1(104.886,45.722) IC36.A1@105.286,45.322 ; v1(104.889,33.725) IC36.R1@105.289,34.125 ; v1@104.889,35.325 IC36.N1@105.289,35.725 ; v1(104.896,44.132) 104.896,44.112 IC36.C1@105.286,43.722 ; v1(105.686,40.128) 105.686,40.122 IC36.H2@106.086,39.722 ; v1(105.686,43.322) IC36.D2@106.086,42.922 ; v1(105.686,44.922) IC36.B2@106.086,44.522 ; v1(105.689,37.725) IC36.K2@106.089,38.125 ; IC36.G7@110.083,40.525 v1(110.483,40.925) ; IC36.K8@110.883,38.125 110.883,38.101 111.151,37.832 111.151,37.76 v1(111.161,37.75) ; IC36.A8@110.883,45.325 v1(111.283,45.725) ; IC36.H9@111.683,39.725 112.083,40.125 v1(112.083,40.128) ; IC36.E9@111.683,42.125 v1(112.083,42.525) ; IC36.D9@111.683,42.925 v1(112.083,43.325) ; IC36.C9@111.683,43.725 112.073,44.114 v1(112.073,44.136) ; IC36.R9@111.686,34.128 v1(112.086,33.728) ; IC36.N9@111.686,35.728 v1(112.086,35.328)
  TopLayer w0.4: v5(108.711,31.198) 108.73,31.179 108.73,31.131 C150.2@109.461,30.4 ; C150.2@109.461,29.625 C150.2@109.461,30.4 ; v5(110.261,31.225) 110.261,31.2 C150.2@109.461,30.4 ; v1(124.561,35.45) IC4.AF1@125.061,35.95 ; v1(125.561,42.45) IC4.W2@126.061,42.95 ; v1(126.561,39.45) IC4.AB3@127.061,39.95 ; v1(127.561,36.45) IC4.AE4@128.061,36.95 ; v1(128.561,33.45) IC4.AH5@129.061,33.95 ; v1(128.561,43.45) IC4.V5@129.061,43.95 ; v1@129.561,40.45 IC4.AA6@130.061,40.95 ; v1(130.561,37.45) IC4.AD7@131.061,37.95 ; v1(131.561,34.45) IC4.AG8@132.061,34.95 ; v1(132.561,41.45) IC4.Y9@133.061,41.95 ; v1(133.561,38.45) IC4.AC10@134.061,38.95 ; v1(134.561,35.45) IC4.AF11@135.061,35.95
  Layer 3 w0.15: v1(11.911,37.678) 12.889,36.7 13.037,36.7 16.007,33.73 16.007,30.604 26.261,20.35 26.854,20.35 34.371,12.833 35.926,12.833 45.028,3.731 52.721,3.731 53.521,4.531 63.148,4.531 66.571,1.108 77.082,1.108 77.576,1.602 80.619,1.602 81.821,0.4 84.91,0.4 85.556,1.047 91.383,1.047 91.811,1.475 v5(91.811,1.525)
  BottomLayer w0.15: C170.2@113.011,44.125 C170.2@113.036,44.1
  BottomLayer w0.2: R128.1@76.58,35.58 76.58,34.975 v2(76.88,34.675)
  BottomLayer w0.25: R302.2@11.903,38.699 11.911,38.691 v1(11.911,37.678)
  BottomLayer w0.3: C462.2@90.685,41.373 90.832,41.52 91.445,41.52 91.647,41.722 v1(91.661,41.722) ; C467.2@90.685,44.081 90.717,44.113 91.651,44.113 v1(91.661,44.122) ; C460.2@90.685,45.915 91.455,45.915 91.647,45.722 v1(91.661,45.722) ; C454.2@90.736,35.175 90.876,35.315 91.654,35.315 v1(91.664,35.325) ; C452.2@90.761,33.775 90.802,33.734 91.654,33.734 v1(91.664,33.725) ; C466.2@91.711,38.325 91.871,38.165 92.013,38.165 v1@92.443,37.734 ; v1(98.858,40.125) 98.868,40.135 99.746,40.135 C465.2@99.761,40.15 ; v1(98.858,42.525) 98.872,42.525 99.037,42.69 99.601,42.69 C456.2@99.761,42.85 ; v1(98.858,44.125) 98.868,44.135 99.721,44.135 C171.2@99.761,44.175 ; v1(98.861,33.728) 98.871,33.718 99.643,33.718 C455.2@99.761,33.6 ; v1(98.861,35.328) 98.871,35.337 99.648,35.337 C453.2@99.761,35.45 ; C457.2@103.911,35.125 104.675,35.125 104.875,35.325 v1(104.889,35.325) ; C463.2@103.915,41.485 104.649,41.485 v1(104.886,41.722) ; C470.2@103.915,44.182 103.975,44.122 104.886,44.122 v1(104.896,44.132) ; C461.2@103.915,46.011 104.597,46.011 v1(104.886,45.722) ; C459.2@103.936,33.775 103.976,33.734 104.879,33.734 v1(104.889,33.725) ; C469.2@104.411,37.15 105.114,37.15 v1(105.689,37.725) ; v1(112.073,44.136) 112.083,44.125 C170.2@113.011,44.125 ; v1(112.083,40.128) 112.09,40.135 112.996,40.135 C464.2@113.036,40.175 ; v1(112.083,42.525) 112.452,42.894 113.005,42.894 C458.2@113.036,42.925 ; v1(112.086,33.728) 112.096,33.718 112.919,33.718 C468.2@112.986,33.651 ; v1(112.086,35.328) 112.1,35.328 112.218,35.446 112.935,35.446 C451.2@112.986,35.498
  BottomLayer w0.4: C484.2@123.861,34.875 123.861,34.9 123.886,34.925 124.014,34.925 124.539,35.45 v1(124.561,35.45) ; v1(126.561,39.45) 126.57,39.45 127.07,38.95 C156.2@127.211,38.95 ; v1(127.561,36.45) 128.061,36.95 C154.2@128.211,36.95 ; C92.2@127.879,44.132 v1(128.561,43.45) ; C155.2@127.911,33.95 128.046,33.95 128.546,33.45 v1(128.561,33.45) ; C482.2@129.082,40.928 v1(129.557,40.453) ; C481.2@130.561,34.526 130.637,34.45 v1(131.561,34.45) 131.561,34.503 132.046,34.988 132.232,34.988 132.257,35.013 C483.2@132.257,35.038 ; v1(130.561,37.45) 130.579,37.432 131.282,37.432 C480.2@131.354,37.361 ; v1(132.561,41.45) 133.061,40.95 C153.2@133.211,40.95 ; v1(133.561,38.45) 133.561,38.47 134.031,38.94 134.144,38.94 C485.2@134.169,38.965 ; C86.2@133.979,35.768 134.135,35.768 134.246,35.657 134.354,35.657 v1(134.561,35.45)
  other v3: 78.611,32.4 79.636,33.025 78.536,33.075 79.086,33.575
P1V8: C137.2 C144.2 IC6.22 IC6.23 L7.1 R39.2 R40.2 R309.2 TP12.1 | length 147.4
  TopLayer w0.15: R40.2@118.922,0.556 118.926,0.56 122.962,0.56 123.336,0.934 123.336,1.775 ; v6(121.086,3.225) 121.673,3.225 121.689,3.209 ; 125.386,1.875 125.461,1.8 TP12.1@125.461,-0.375
  Layer 3 w0.15: v1(8.531,37.812) 12.961,33.382 12.961,29.15 22.561,19.55 22.561,15.17 27.376,10.355 32.531,10.355 39.762,3.124 53.19,3.124 53.796,3.731 62.817,3.731 65.882,0.666 78.576,0.666 78.643,0.733 80.962,0.733 81.87,-0.175 91.224,-0.175 95.523,4.125 101.017,4.125 101.214,4.323 103.965,4.323 104.069,4.219 107.79,4.219 108.046,3.963 110.216,3.963 110.46,4.207 115.243,4.207 117.8,1.65 119.161,1.65 120.736,3.225 v6(121.086,3.225)
  BottomLayer w0.15: v1(8.531,37.812) 8.531,38.449 8.618,38.537 8.65,38.537 9.025,38.912 R309.2@9.025,38.962
P1V8_USB: C206.2 IC18.2 IC18.31 IC18.43 | length 25.2
  TopLayer w0.3: v2(18.142,60.036) 18.947,60.036 19.376,60.465 IC18.31@19.376,60.858 ; IC18.2@24.376,68.758 24.376,69.209 24.715,69.548 27.162,69.548 C206.2@27.33,69.38 ; IC18.43@25.628,61.506 v2@27.341,61.506 ; v1(27.011,68.3) 27.011,68.624 27.38,68.993 27.38,69.33 C206.2@27.288,69.422
  Layer 3 w0.3: v2(18.142,60.036) 18.759,60.036 19.325,60.602 26.437,60.602 27.341,61.506 27.341,67.97 v1(27.011,68.3)
  other v2: 27.341,61.481
P2V5: C31.2 C33.2 C34.2 C35.2 C37.2 C39.2 C52.2 C57.2 C58.2 C59.2 C60.2 C61.2 C62.2 C64.2 C65.2 C66.2 C67.2 C68.2 C69.2 C75.2 C76.2 C78.2 C79.2 C80.2 C81.2 C82.2 C83.2 C84.2 C85.2 C87.2 C88.2 C89.2 C90.2 C93.2 C94.2 C125.2 C126.2 C127.2 C128.2 C129.2 C136.2 C138.2 C139.2 C140.2 C146.2 C147.2 C148.2 C149.2 C194.2 C195.2 C196.2 C200.1 C201.1 C203.1 C204.2 C217.2 C218.2 C219.2 C238.2 C245.1 C295.1 C296.2 C297.1 C299.2 C300.1 C301.2 C308.2 C309.2 C310.2 C311.2 C422.1 C428.2 C429.2 C430.2 C431.2 C432.2 C433.2 D17.1 F1.1 IC4.A6 IC4.A31 IC4.AA31 IC4.AB28 IC4.AC25 IC4.AD32 IC4.AE29 IC4.AF26 IC4.AG33 IC4.AH30 IC4.AJ27 IC4.AK34 IC4.AL31 IC4.AM28 IC4.AN25 IC4.AP32 IC4.B3 IC4.B28 IC4.C10 IC4.C25 IC4.D7 IC4.D32 IC4.E4 IC4.E29 IC4.F1 IC4.F11 IC4.F26 IC4.G8 IC4.G33 IC4.H5 IC4.H30 IC4.J2 IC4.J12 IC4.J27 IC4.K9 IC4.K24 IC4.K34 IC4.L6 IC4.L13 IC4.L22 IC4.L31 IC4.M3 IC4.M12 IC4.M28 IC4.N10 IC4.N25 IC4.P7 IC4.P32 IC4.R4 IC4.R29 IC4.T1 IC4.T11 IC4.T26 IC4.U8 IC4.U33 IC4.V30 IC4.W27 IC4.Y24 IC4.Y34 IC14.8 IC14.9 IC14.14 IC14.15 IC16.14 IC17.6 IC19.6 IC20.6 IC32.2 J8.2 OSC2.2 OSC2.6 R1.1 R34.2 R35.2 R41.2 R42.2 R49.2 R50.2 R52.1 R56.1 R57.2 R58.2 R61.2 R94.2 R95.2 R96.2 R139.1 R150.2 R162.2 R163.2 R164.2 R165.2 R170.2 R171.2 R210.1 R253.1 R289.2 T7.1 TP8.1 TP32.1 | length 163.1
  TopLayer w0.095: v2(17.304,47.684) 17.329,47.659 17.5,47.659 17.512,47.648 C296.2@17.911,47.648
  TopLayer w0.15: v1(122.986,81.375) 123.591,81.375 R61.2@123.616,81.35 ; OSC2.2@130.933,88.85 OSC2.2@130.961,88.878 ; v2@148.661,83.515 149.144,83.515 R42.2@149.194,83.465
  TopLayer w0.2: C219.2@10.722,68.161 9.794,68.161 8.53,69.425 v2(7.836,69.425) 7.836,70.418 7.636,70.618 7.636,71.2 9.137,72.701 12.913,72.701 13.171,72.959 IC17.6@13.171,73.887 ; C219.2@10.727,68.184 11.269,68.727 11.269,69.012 11.266,69.015 IC19.6@11.266,69.312 ; C218.2@11.593,63.353 11.901,63.661 IC20.6@11.901,64.489 ; R58.2@61.331,79.025 61.356,79.05 v1(61.861,79.05) ; R35.2@66.961,73.77 R34.2@68.011,73.77 68.052,73.811 v2(68.052,74.336) ; v2(69.936,74.347) 69.936,73.795 R41.2@69.961,73.77 R50.2@71.011,73.77 ; v5(159.461,76.075) C204.2@159.461,76.675 159.461,78.42 IC16.14@159.466,78.425
  TopLayer w0.254: R56.1@24.632,38.038 v5(25.504,38.038) ; v3(32.486,45.686) R253.1@32.486,46.316 ; 79.461,13.225 79.511,13.275 TP8.1@79.511,14.825 ; C422.1@84.686,43.275 84.687,43.276 v6(85.142,43.278) v6(85.142,43.278) ; v2(87.561,13.1) 87.574,13.087 87.574,12.562 R49.2@87.586,12.55 ; R162.2@121.621,74.115 ccw(c121.45,74.286) R162.2@121.637,74.133 ; v1(121.667,74.708) 121.644,74.685 121.644,74.14 R162.2@121.637,74.133 ; C245.1@122.311,78.875 v6(122.786,78.875) ; R165.2@124.621,74.115 124.604,74.133 R162.2@121.637,74.133 ; OSC2.2@130.961,88.878 v2(130.961,90.125) ; v1(141.236,79.05) 141.258,79.072 141.772,79.072 141.793,79.093 141.793,80.066 R171.2@141.796,80.068 ; C203.1@144.761,69.948 v1@145.155,70.342 ; v1@145.155,70.342 ccw(c145.026,70.47) v1(145.208,70.47) ; C297.1@168.586,56.05 168.611,56.05 168.925,56.364 168.925,56.41 v1(168.953,56.438) ; C300.1@170.703,59.902 170.713,59.902 v1(171.061,60.25) ; v4(180.466,83.63) 181.29,83.63 C52.2@181.291,83.628 ; C52.2@181.294,83.631 181.294,85.776 J8.2@181.393,85.875 ; v1(192.411,28.425) 192.45,28.425 192.803,28.777 192.913,28.777 C295.1@192.986,28.85
  TopLayer w0.3: v2(10.786,63.275) 10.824,63.313 11.553,63.313 C218.2@11.593,63.353
  TopLayer w0.4: IC32.2@122.636,86.3 122.619,86.317 122.619,87.694 C196.2@122.601,87.712 122.61,87.72 123.201,87.72 v5(123.21,87.729) ; v1(124.561,46.45) IC4.T1@125.061,45.95 ; v1(124.561,56.45) IC4.F1@125.061,55.95 ; v1(125.561,53.45) IC4.J2@126.061,52.95 ; v1(126.561,50.45) IC4.M3@127.061,49.95 ; IC4.B3@127.061,59.95 v1(127.561,60.45) ; v1(127.561,47.45) IC4.R4@128.061,46.95 ; v1(127.561,57.45) IC4.E4@128.061,56.95 ; v1(128.561,54.45) IC4.H5@129.061,53.95 ; v1(129.561,51.45) IC4.L6@130.061,50.95 ; v1(129.561,61.45) IC4.A6@130.061,60.95 ; v1(130.561,48.45) IC4.P7@131.061,47.95 ; v1(130.561,58.45) IC4.D7@131.061,57.95 ; v1(131.561,45.45) IC4.U8@132.061,44.95 ; v1(131.561,55.45) IC4.G8@132.061,54.95 ; v1(132.561,52.45) IC4.K9@133.061,51.95 ; OSC2.6@133.473,84.65 133.87,84.253 135.135,84.253 C238.2@135.166,84.283 135.179,84.27 135.76,84.27 v2(135.773,84.257) ; v1(133.561,49.45) IC4.N10@134.061,48.95 ; v1(133.561,59.45) IC4.C10@134.061,58.95 ; v1(134.561,46.45) IC4.T11@135.061,45.95 ; v1(134.561,56.45) IC4.F11@135.061,55.95 ; v1(135.561,50.45) IC4.M12@136.061,49.95 ; v1(135.561,53.45) IC4.J12@136.061,52.95 ; v1(136.561,51.45) IC4.L13@137.061,50.95 ; IC4.L22@146.061,50.95 v1(146.561,51.45) ; IC4.Y24@148.061,41.95 v1(148.561,41.45) ; IC4.K24@148.061,51.95 v1(148.561,52.45) ; IC4.AN25@149.061,28.95 v1(149.561,28.45) ; IC4.AC25@149.061,38.95 v1(149.561,38.45) ; IC4.N25@149.061,48.95 v1(149.561,49.45) ; IC4.C25@149.061,58.95 v1(149.561,59.45) ; IC4.AF26@150.061,35.95 v1(150.561,35.45) ; IC4.T26@150.061,45.95 v1(150.561,46.45) ; IC4.F26@150.061,55.95 v1(150.561,56.45) ; IC4.AJ27@151.061,32.95 v1(151.561,32.45) ; IC4.W27@151.061,42.95 v1(151.561,42.45) ; IC4.J27@151.061,52.95 v1(151.561,53.45) ; IC4.AM28@152.061,29.95 v1(152.561,29.45) ; IC4.AB28@152.061,39.95 v1(152.561,39.45) ; IC4.M28@152.061,49.95 v1(152.561,50.45) ; IC4.B28@152.061,59.95 v1(152.561,60.45) ; IC4.AE29@153.061,36.95 v1(153.561,36.45) ; IC4.R29@153.061,46.95 v1(153.561,47.45) ; IC4.E29@153.061,56.95 153.07,56.95 v1(153.552,56.468) ; IC4.AH30@154.061,33.95 v1(154.561,33.45) ; IC4.V30@154.061,43.95 v1(154.561,43.45) ; IC4.H30@154.061,53.95 v1(154.561,54.45) ; v1(154.561,60.45) IC4.A31@155.061,60.95 ; IC4.AL31@155.061,30.95 v1(155.561,30.45) ; IC4.AA31@155.061,40.95 v1(155.561,40.45) ; IC4.L31@155.061,50.95 v1(155.561,51.45) ; v1(155.561,58.45) IC4.D32@156.061,57.95 ; IC4.AP32@156.061,27.95 v1(156.561,27.45) ; IC4.AD32@156.061,37.95 v1(156.561,37.45) ; IC4.P32@156.061,47.95 v1(156.561,48.45) ; IC4.AG33@157.061,34.95 v1(157.561,34.45) ; IC4.U33@157.061,44.95 v1(157.561,45.45) ; IC4.G33@157.061,54.95 v1(157.561,55.45) ; IC4.AK34@158.061,31.95 v1(158.561,31.45) ; IC4.Y34@158.061,41.95 v1(158.561,41.45) ; IC4.K34@158.061,51.95 v1(158.561,52.45) ; C65.2@168.736,41.765 C84.2@168.736,44.99
  TopLayer w0.5: C129.2@117.797,61.524 117.797,61.712 117.986,61.902 v3(118.675,61.902) ; C129.2@117.797,62.702 117.797,62.808 117.986,62.998 v3(118.726,62.998)
  BottomLayer w0.15: v1(122.261,51.75) 122.29,51.721 R1.1@122.29,51.233 ; R210.1@123.331,48.436 123.345,48.45 v1(123.861,48.45) ; v2(152.455,79.1) 152.826,79.1 R96.2@153.061,79.12 ; v2(153.754,90.747) 154.409,90.747 R95.2@154.411,90.745 ; v2(161.936,91.35) 161.936,90.96 R94.2@161.961,90.745
  BottomLayer w0.2: v6(147.561,25.725) 147.599,25.687 147.599,25.578 147.814,25.364 C200.1@147.814,25.222 ; v6@147.857,63.884 147.862,63.879 148.207,63.879 C201.1@148.211,63.875
  BottomLayer w0.254: R289.2@-1.4,81.47 -0.533,81.47 v1(-0.531,81.469) ; T7.1@9.111,43.767 9.115,43.763 v1(9.786,43.763) ; v1(17.917,44.425) 17.917,45.179 R57.2@17.923,45.185 ; v2(78.797,65.854) 80.821,65.854 F1.1@80.834,65.841 ; v2(80.834,64.7) F1.1@80.834,65.841 ; v2(82.809,65.841) F1.1@80.834,65.841
  BottomLayer w0.3: R139.1@13.661,48.615 13.661,49.841 13.795,49.975 v2(13.795,50.029) ; D17.1@151.091,12.795 R150.2@152.836,12.795 v6(152.836,13.325)
  BottomLayer w0.4: v1(124.561,46.45) 124.786,46.45 125.186,46.05 C309.2@125.211,46.05 ; v1(124.561,56.45) 124.561,56.856 124.651,56.946 124.651,57.09 C31.2@124.761,57.2 125.686,57.2 125.936,57.45 v1(127.561,57.45) 127.561,56.7 C37.2@127.611,56.65 ; v1(125.561,53.45) 126.061,52.95 C82.2@126.211,52.95 ; C310.2@125.886,50.95 126.061,50.95 126.361,50.65 v1(126.561,50.45) ; v1(127.561,47.45) 128.061,47.95 C80.2@128.061,48.05 ; v1(129.561,51.45) 129.561,51.186 C35.2@129.973,50.775 ; C79.2@129.836,58.075 130.211,58.45 v1(130.561,58.45) 131.19,58.45 131.406,58.45 131.651,58.205 131.651,58.185 131.741,58.095 R52.1@131.761,58.095 ; v1(130.561,48.45) 131.061,47.95 C68.2@131.211,47.95 ; C62.2@130.911,45.65 131.361,45.65 v1(131.561,45.45) ; C39.2@131.311,56.15 131.421,56.04 131.421,55.59 v1(131.561,55.45) ; v1(132.561,52.45) 132.574,52.45 133.074,51.95 C138.2@133.211,51.95 ; C57.2@132.993,50.052 133.174,49.871 133.174,49.837 v1(133.561,49.45) ; C125.2@134.911,50.95 C125.2@134.936,50.95 135.04,50.95 135.54,50.45 v1(135.561,50.45) ; C93.2@135.243,54.132 135.243,53.976 135.561,53.658 v1(135.561,53.45) ; v1(148.561,52.45) 148.597,52.45 149.097,51.95 C311.2@149.261,51.95 ; C66.2@148.849,35.753 149.005,35.753 149.201,35.95 150.061,35.95 v1(150.561,35.45) 151.061,34.95 C140.2@151.199,34.95 ; C148.2@148.861,48.95 149.061,48.95 v1(149.561,49.45) 150.043,49.932 C67.2@150.143,49.932 ; C85.2@149.511,58.75 149.561,58.8 v1(149.561,59.45) ; v1(149.561,38.45) 150.061,37.95 C76.2@150.211,37.95 ; C58.2@149.611,56.15 149.721,56.26 150.371,56.26 v1(150.561,56.45) ; C94.2@149.745,29.222 149.754,29.212 149.754,29.076 149.561,28.883 v1(149.561,28.45) 149.711,28.45 150.186,27.975 C432.2@150.211,27.975 ; C94.2@149.754,29.232 150.71,29.232 150.992,28.95 152.061,28.95 v1(152.561,29.45) 153.061,28.95 C147.2@153.211,28.95 ; v1(150.561,46.45) 151.061,45.95 C127.2@151.261,45.95 ; v1(151.561,32.45) 151.651,32.36 151.651,31.71 C34.2@151.761,31.6 ; v1(151.561,42.45) 151.701,42.31 151.701,41.735 C59.2@151.811,41.625 ; v1(151.561,53.45) 152.061,52.95 C64.2@152.261,52.95 ; C429.2@151.711,60.783 151.821,60.673 152.338,60.673 v1(152.561,60.45) 152.809,60.202 153.386,60.202 C428.2@153.496,60.092 ; v1(152.561,39.45) 153.061,38.95 C83.2@153.211,38.95 ; v1(152.561,50.45) 152.736,50.45 153.236,49.95 C89.2@153.261,49.95 ; v1(153.552,56.468) 153.735,56.285 154.242,56.285 C431.2@154.267,56.26 ; v1(153.561,36.45) 154.074,35.937 C308.2@154.211,35.937 ; v1(153.561,47.45) 154.061,46.95 C69.2@154.211,46.95 ; C78.2@153.711,42.75 154.411,43.45 v1(154.561,43.45) ; v1(154.561,33.45) 155.061,32.95 C146.2@155.211,32.95 ; v1(154.561,54.45) 155.061,53.95 C90.2@155.236,53.95 ; v1(154.561,60.45) C430.2@155.711,60.45 ; C60.2@154.911,30.95 155.061,30.95 v1(155.561,30.45) ; C433.2@155.3,59.138 155.325,59.138 155.35,59.113 155.35,59.088 155.561,58.877 v1(155.561,58.45) ; v1(155.561,40.45) 156.061,39.95 C126.2@156.223,39.95 ; v1(155.561,51.45) 156.061,50.95 C149.2@156.261,50.95 ; C33.2@155.661,27.7 155.911,27.45 v1(156.561,27.45) ; C128.2@155.961,37.95 156.061,37.95 v1(156.561,37.45) ; C87.2@155.961,48.95 156.061,48.95 v1(156.561,48.45) ; C139.2@156.896,34.95 157.061,34.95 v1(157.561,34.45) ; C88.2@156.961,45.95 157.061,45.95 v1(157.561,45.45) ; C81.2@157.061,54.8 157.061,54.95 v1(157.561,55.45) ; C61.2@157.911,31.95 158.061,31.95 v1(158.561,31.45) ; C75.2@157.911,51.95 158.061,51.95 v1(158.561,52.45) ; C136.2@157.961,41.95 158.061,41.95 v1(158.561,41.45)
  other v1: 167.686,42.475 167.686,43.425 167.686,44.475
  other v2: 148.561,83.54
  other v3: 79.011,10.475 79.936,10.475 79.011,11.325 79.936,11.325 79.011,12.225 79.936,12.225 79.011,13.075 79.936,13.075
  other v6: 147.782,63.934
P2V5_CLK_Si1: C406.2 C407.2 C408.2 IC33.12 IC33.16 IC33.18 IC33.34 IC33.44 L9.1 | length 32.3
  TopLayer w0.254: v2(181.241,73.562) 181.254,73.55 C408.2@181.936,73.55 182.602,74.216 183.102,74.216 IC33.18@183.111,74.225 183.811,74.225 184.036,74.45 184.036,75.05 183.87,75.216 183.12,75.216 IC33.16@183.111,75.225 ; L9.1@181.604,79.799 181.611,79.792 C406.2@181.611,78.425 ; v3(182.53,78.396) 181.707,78.396 C406.2@181.611,78.3 181.611,78.275 182.652,77.234 183.102,77.234 IC33.12@183.111,77.225 ; IC33.34@190.011,72.225 190.02,72.234 190.62,72.234 190.861,72.475 v2(190.861,72.55) ; IC33.44@190.011,77.225 191.036,77.225 C407.2@191.161,77.35 191.843,77.35 v2(191.856,77.338)
  BottomLayer w0.6: v2(181.241,73.562) 181.241,77.108 v3(182.53,78.396) 184.09,78.396 184.811,77.675 191.518,77.675 v2(191.856,77.338) 191.856,73.545 v2(190.861,72.55)
P2V5_fused: C423.2 F1.2 J5.18 | length 6.5
  TopLayer w0.4: v5@82.367,71.753 J5.18@85.061,71.753
  BottomLayer w0.4: F1.2@80.834,70.041 81.207,70.413 C423.2@81.207,71.804 ; C423.2@81.161,71.85 C423.2@81.207,71.804 ; v5(83.028,71.757) 83.009,71.776 81.235,71.776 C423.2@81.207,71.804
  other v5: 82.417,71.754
P2V5_LDO: C16.2 C29.2 IC3.9 IC3.10 IC12.6 L9.2 L36.1 L37.1 R248.2 TP4.1 | length 154.7
  TopLayer w0.2: R248.2@61.511,55.08 63.188,55.08 63.611,54.657 66.768,54.657 67.561,55.45 67.561,57.979 ; 70.265,58.046 70.311,58 71.711,58 72.186,58.475 72.186,59.733 72.303,59.85 72.986,59.85 73.086,59.95 IC12.6@74.286,59.95
  TopLayer w0.254: v2(179.054,80.162) 179.673,80.162 180.02,79.815 L9.2@180.004,79.799 179.847,79.642 v2(179.098,79.642)
  TopLayer w0.3: IC3.9@61.011,58.8 61.261,58.8 61.361,58.9 62.401,58.9 62.551,59.05 62.551,59.055 62.346,59.26 62.21,59.26 62.17,59.3 IC3.10@61.011,59.3 ; 68.261,59.05 68.261,57.3 69.511,56.05 TP4.1@70.261,56.05
  BottomLayer w1: v4(66.511,60.529) 66.432,60.529 65.711,61.25 65.711,62.825 70.936,68.05 70.936,72.675 79.861,81.6 114.336,81.6 115.661,80.275 116.88,80.275 118.535,78.62 119.737,78.62 120.586,79.469 120.586,79.484 121.172,80.07 137.656,80.07 139.536,81.95 145.611,81.95 146.623,80.938 178.214,80.938 179.098,80.053 v2(179.098,79.642)
  other v4: 65.786,61.175